# Altium PCB 7805.PcbDoc
Units mil, origin at the board's own origin, x right, y up, seen from the top; angles counter-clockwise.
Board outline 3175 x 1085 mil, 2 copper layers (Top Layer, Bottom Layer); 10 components, 5 nets, 22 pads, 0 vias.
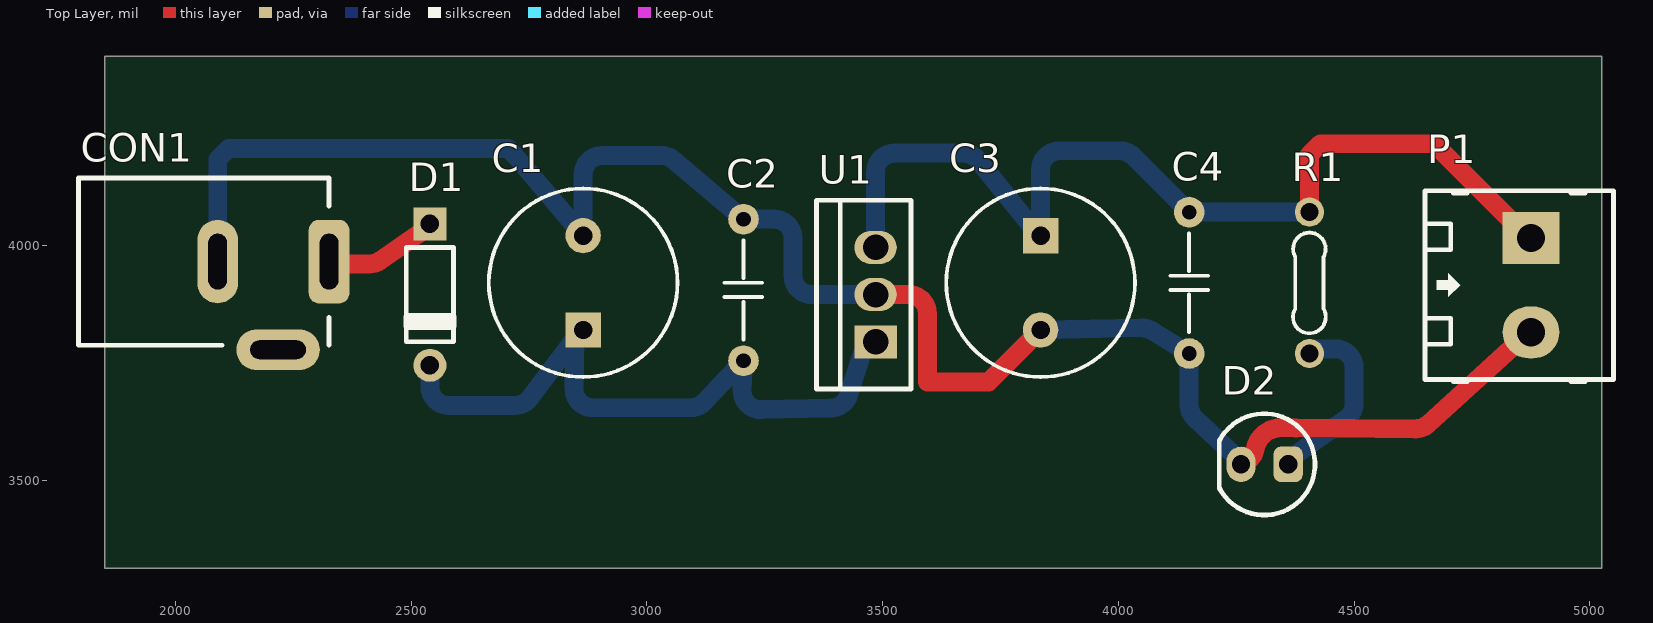
[diagram p0: Top Layer view]
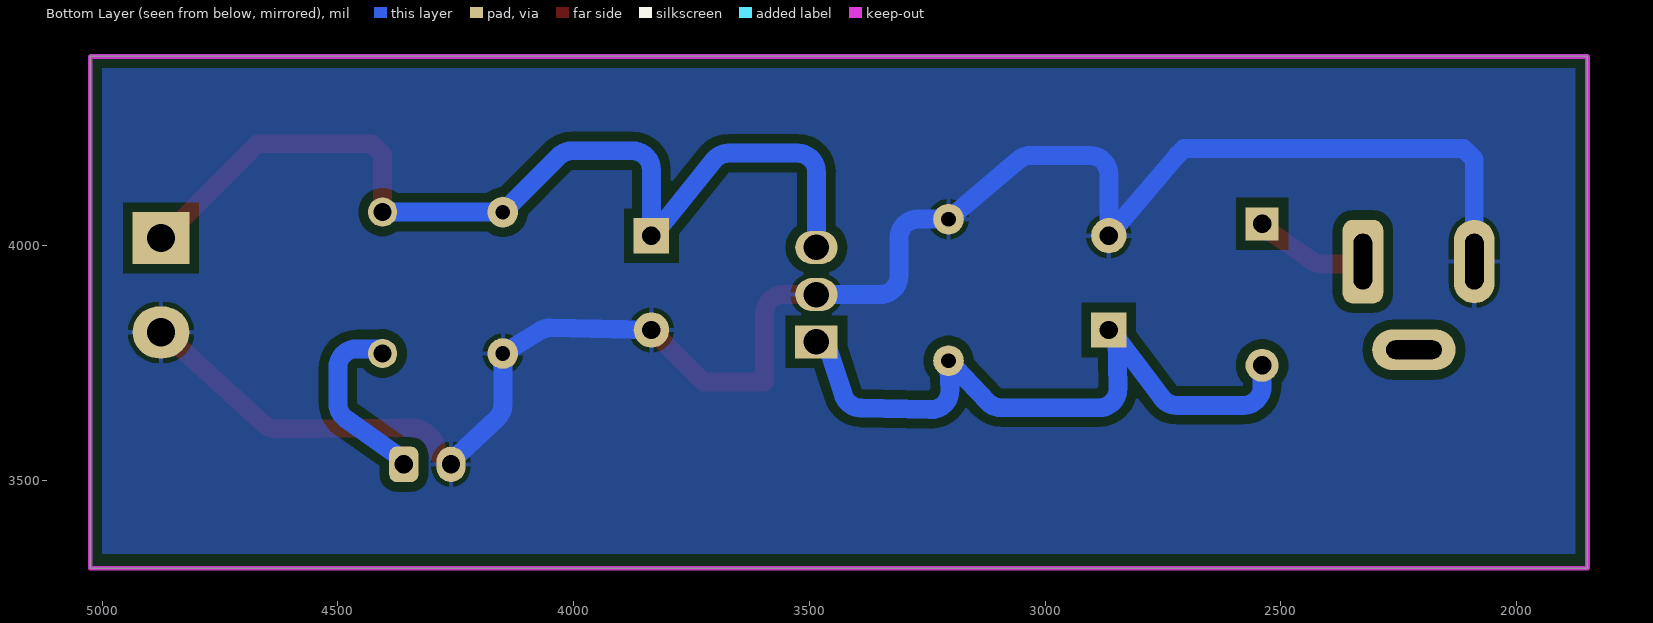
[diagram p1: Bottom Layer view, seen from below]
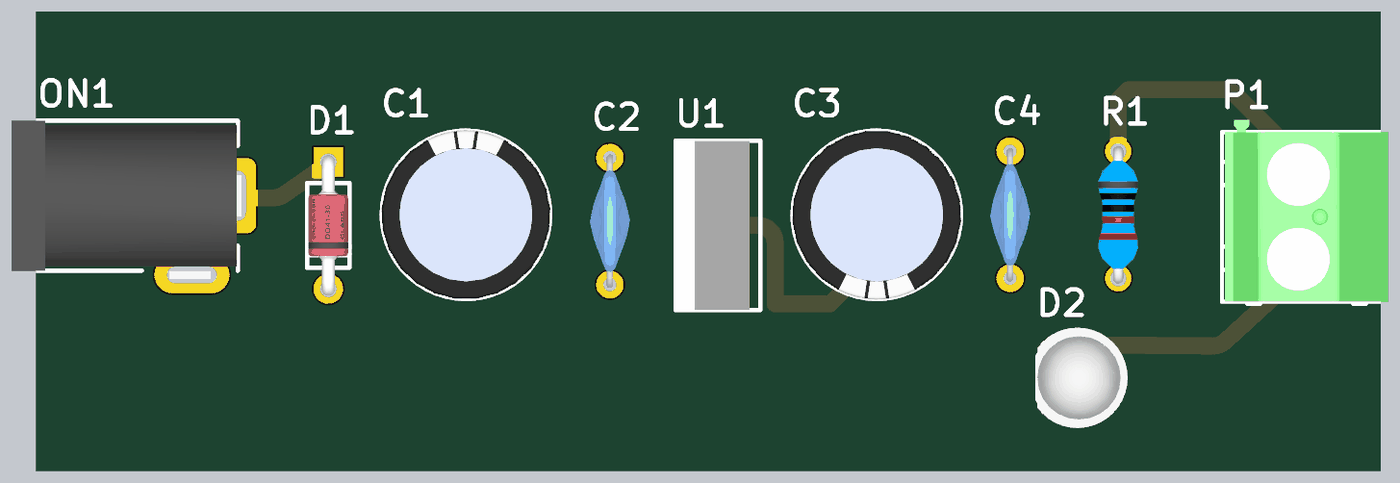
[diagram p2: 3D render of the assembled board from above, using the file's embedded part models]

## Layer stack, top to bottom
Top Solder: solder mask 0.4, Solder Resist, Dk 3.5
Top Layer: signal copper 1.4
Dielectric 1: dielectric 12.6, FR-4, Dk 4.8
Bottom Layer: signal copper 1.4
Bottom Solder: solder mask 0.4, Solder Resist, Dk 3.5

## Board outline
1850,3315 1850,4400 5025,4400 5025,3315

## Design rules (kind name [scope] priority, off if disabled: settings)
Clearance [All] p1: gap=20 ignorepadtopadclearanceinfootprint=FALSE
PolygonConnect [All] p1: connectstyle=Relief reliefconductorwidth=10 reliefentries=4 polygonreliefangle="90 Angle" airgapwidth=10
RoutingVias [All] p1: holewidth=28 width=50 viastyle="Through Hole" minholewidth=28 minwidth=50 maxholewidth=28 maxwidth=50
SolderMaskExpansion [All] p1: expansion=4 istentingtop=FALSE
Width [All] p1: maxlimit=100 minlimit=20 preferedwidth=40
30 further rules are at their usual default settings.

## Components (designator, comment, footprint, x,y, rotation, side; value= is the part's Value field where it differs from the comment)
C1 "1000uF" CYL/D.400/LS.200 2865,3920 r90 top
C2 "104" "CAP Ceramic/W300" 3205,3755 r90 top
C3 "1000uF" CYL/D.400/LS.200 3835,3920 r270 top
C4 "104" "CAP Ceramic/W300" 4150,4070 r270 top
CON1 "CON DC PWR" CONN/DC/PWR/5.0MM 2326.22,3965 r0 top
D1 "IN4007" DO-41 2540,4045 r270 top
D2 "Led" "LED 5MM - RED" 4310,3535 r180 top
P1 "Header 2" HDR/Terminal/2 4875,3915 r270 top
R1 "1K" "R 1/4W/300" 4405,4070 r270 top
U1 "78xx" TO-220 3485,3795 r90 top

## Footprints (in the part's own frame and the unit in brackets; to place one, negate y for a bottom-side part, rotate by r counter-clockwise, add the part's x,y. Pads: shape width x height; smd on the part's side, far side on the other; paste and mask are expansions set on the pad)
"CAP Ceramic/W300" [mil]
  round 65 hole 31: 1(0,0) 2(300,0)
  silkscreen extent 45,-40 255,40, body extent -8,-47 307,47, height 340
CONN/DC/PWR/5.0MM [mm]
  rrect50% 2.2x4.5 hole 1 slot 3 at 90 deg: 1(0,0)
  oval 2.2x4.5 hole 1 slot 3 at 90 deg: 2(-6,0)
  oval 4.5x2.2 hole 1 slot 3 at 0 deg: 3(-2.75,-4.75)
  silkscreen extent -13.5,-4.5 0,4.5, body extent -13.58,-5 0.25,4.5, height 11.02
CYL/D.400/LS.200 [mil]
  rect 75x75 hole 39: 1(-100,0)
  round 75 hole 39: 2(100,0)
  silkscreen extent -200,-200 200,200, body extent -198,-199 200,199, height 500
DO-41 [mil]
  rect 70x70 hole 39.37: 1(0,0)
  round 70 hole 39.37: 2(300,0)
  silkscreen extent 50,-55 250,55, body extent -15,-47 315,47, height 99
HDR/Terminal/2 [mil] "Header 2, 2 pin, hight 400mil, Pin to Pin 200mil, Colour Green"
  rect 110x120 hole 60: 1(-100,0)
  oval 110x120 hole 60: 2(100,0)
  silkscreen extent -200,-225 205,175, body extent -229,-218 200,168, height 559
"LED 5MM - RED" [mil]
  rrect50% 62x75 hole 39: 1(-50,0)
  oval 62x75 hole 39: 2(50,0)
  silkscreen extent -107,-108 96,108, body extent -117,-118 96,119, height 340
"R 1/4W/300" [mil] "Through hole resitor, axial 300mils, 1/4W"
  round 62 hole 38: 1(0,0) 2(300,0)
  silkscreen extent 44,-35 257,35, body extent -12,-47 312,47, height 97
TO-220 [mil]
  rect 70x90 hole 54: 1(0,0)
  oval 70x90 hole 54: 2(100,0) 3(200,0)
  silkscreen extent -100,-75 300,125, body extent -100,-50 300,130, height 730

## Part data
C1 C3: library part Capacitor, "Capacitor pol"
C2 C4: library part "Capacitor NP", "Capacitor non-pol"
CON1: "DC input connector"
D1: library part Diode, "Default Diode"
D2: "Typical LED"
P1: "Header, 2-Pin"
R1: library part Resistor, "Resistor"
U1: "LDO Fixed Voltage regulator"

## Nets (pads, with @x,y where several pads share a name; then routed paths per layer and width w, separated by ;. In a path a pad name is that pad's centre, name@x,y a point inside that pad or via, vN(x,y) a via of type N, cw(c..) or ccw(c..) an arc to the next point about the centre after c; other vN are vias at no path point)
+5: C3.1 C4.1 P1.1 R1.1 U1.3 | length 2117.2
  Top Layer w40: R1.1 4405,4191.57 4428.43,4215 4670,4215 4870,4015 P1.1
  Bottom Layer w40: U1.3 3485,4155 cw(c3525,4155) 3525,4195 3671.2,4195 cw(c3671.2,4155) 3702.32,4180.13 3817.5,4037.5 C3.1 3835,4160 cw(c3875,4160) 3875,4200 4003.43,4200 cw(c4003.43,4160) 4031.76,4188.24 C4.1 R1.1 ; P1.1 P1.1@4880,4050
GND: C1.2 C2.2 C3.2 C4.2 CON1.2 D2.2 P1.2 U1.2 | length 3943.7
  Top Layer w40: U1.2 3555,3895 cw(c3555,3855) 3595,3855 3595,3710 3725,3710 C3.2 ; D2.2 ccw(c4250.5,3573.86) 4289.86,3566.73 cw(c4344.5,3557) 4344.5,3612.5 4375.5,3612.5 cw(c4375.5,3557) 4375.98,3612.5 4376.04,3612.5 4629.76,3610.3 ; 4629.78,3610.3 ccw(c4630.1,3650.3) 4657.06,3620.75 4870,3815 P1.2
  Bottom Layer w40: CON1.2 2090,4181.57 2113.43,4205 2705.32,4205 2719.39,4190.94 C1.2 2865,4150 cw(c2905,4150) 2905,4190 3030.38,4190 cw(c3030.38,4150) 3056.17,4180.57 C2.2 3270,4055 cw(c3270,4015) 3310,4015 3310,3935 ccw(c3350,3935) 3350,3895 U1.2 ; C3.2 4048.27,3824.74 4048.34,3824.74 cw(c4049.16,3784.75) 4070.01,3818.88 C4.2 4150,3661.57 ccw(c4190,3661.57) 4162.7,3632.33 4178.81,3617.29 4260,3541.5 D2.2 ; P1.2@4870,3815 P1.2
NetC1_1: C1.1 C2.1 D1.2 U1.1 | length 1474.6
  Bottom Layer w40: D1.2 2540,3700 ccw(c2580,3700) 2580,3660 2720.49,3660 ccw(c2720.49,3700) 2752.47,3675.98 C1.1@2847.5,3802.5 ; C1.1@2860,3802.5 C1.1 C1.1@2847.5,3802.5 ; U1.1 3460,3780 3428.02,3682.02 cw(c3389.99,3694.43) 3391.01,3654.44 3390.92,3654.44 3242.84,3651 cw(c3242,3690.99) 3202.04,3692.83 3202.04,3692.89 C2.1 3121.83,3667.45 cw(c3092.83,3695) 3092.83,3655 2885.68,3655 cw(c2885.68,3695) 2845.69,3695.61 2845.69,3695.68 C1.1@2847.5,3802.5
NetCON1_1: CON1.1 D1.1 | length 350.3
  Top Layer w40: CON1.1@2347.87,4025 CON1.1 2347.87,3960 2411.82,3960 ccw(c2411.82,4000) 2434.66,3967.16 2525,4030 D1.1
  Bottom Layer w40: CON1.1 CON1.1@2347.87,3950 ; D1.1@2529.29,4030 D1.1
NetD2_1: D2.1 R1.2 | length 389.6
  Bottom Layer w40: D2.1 4371,3552.5 4483.1,3631.78 ccw(c4460,3664.44) 4500,3664.44 4500,3740 ccw(c4460,3740) 4460,3780 R1.2@4405,3780
pads on no net: CON1.3

## Polygon pours and split planes (outlines as drawn)
GND on Bottom Layer "GND_L02_P000" (solid, remove dead copper, pour order 0): 1869.98,3345 1875,4375 5000,4375 5000,3345

## Keep-outs
Bottom Layer:
  lines w10: 1850,3315 1850,4400 5025,4400 5025,4380 5025,3315 1850,3315